# Altium PCB Copy of ASCIIPCB2.pcbdoc (part 2 of 2)
Units mm, origin at the board's own origin, x right, y up, seen from the top; angles counter-clockwise.
Board outline 98.81 x 68.1 mm, 4 copper layers (Top Layer, Signal Layer 1, Signal Layer 2, Bottom Layer), stack 0.778 mm thick; 113 components, 59 nets, 280 pads, 406 vias.
Unrouted connection lines stored in the file: 16.
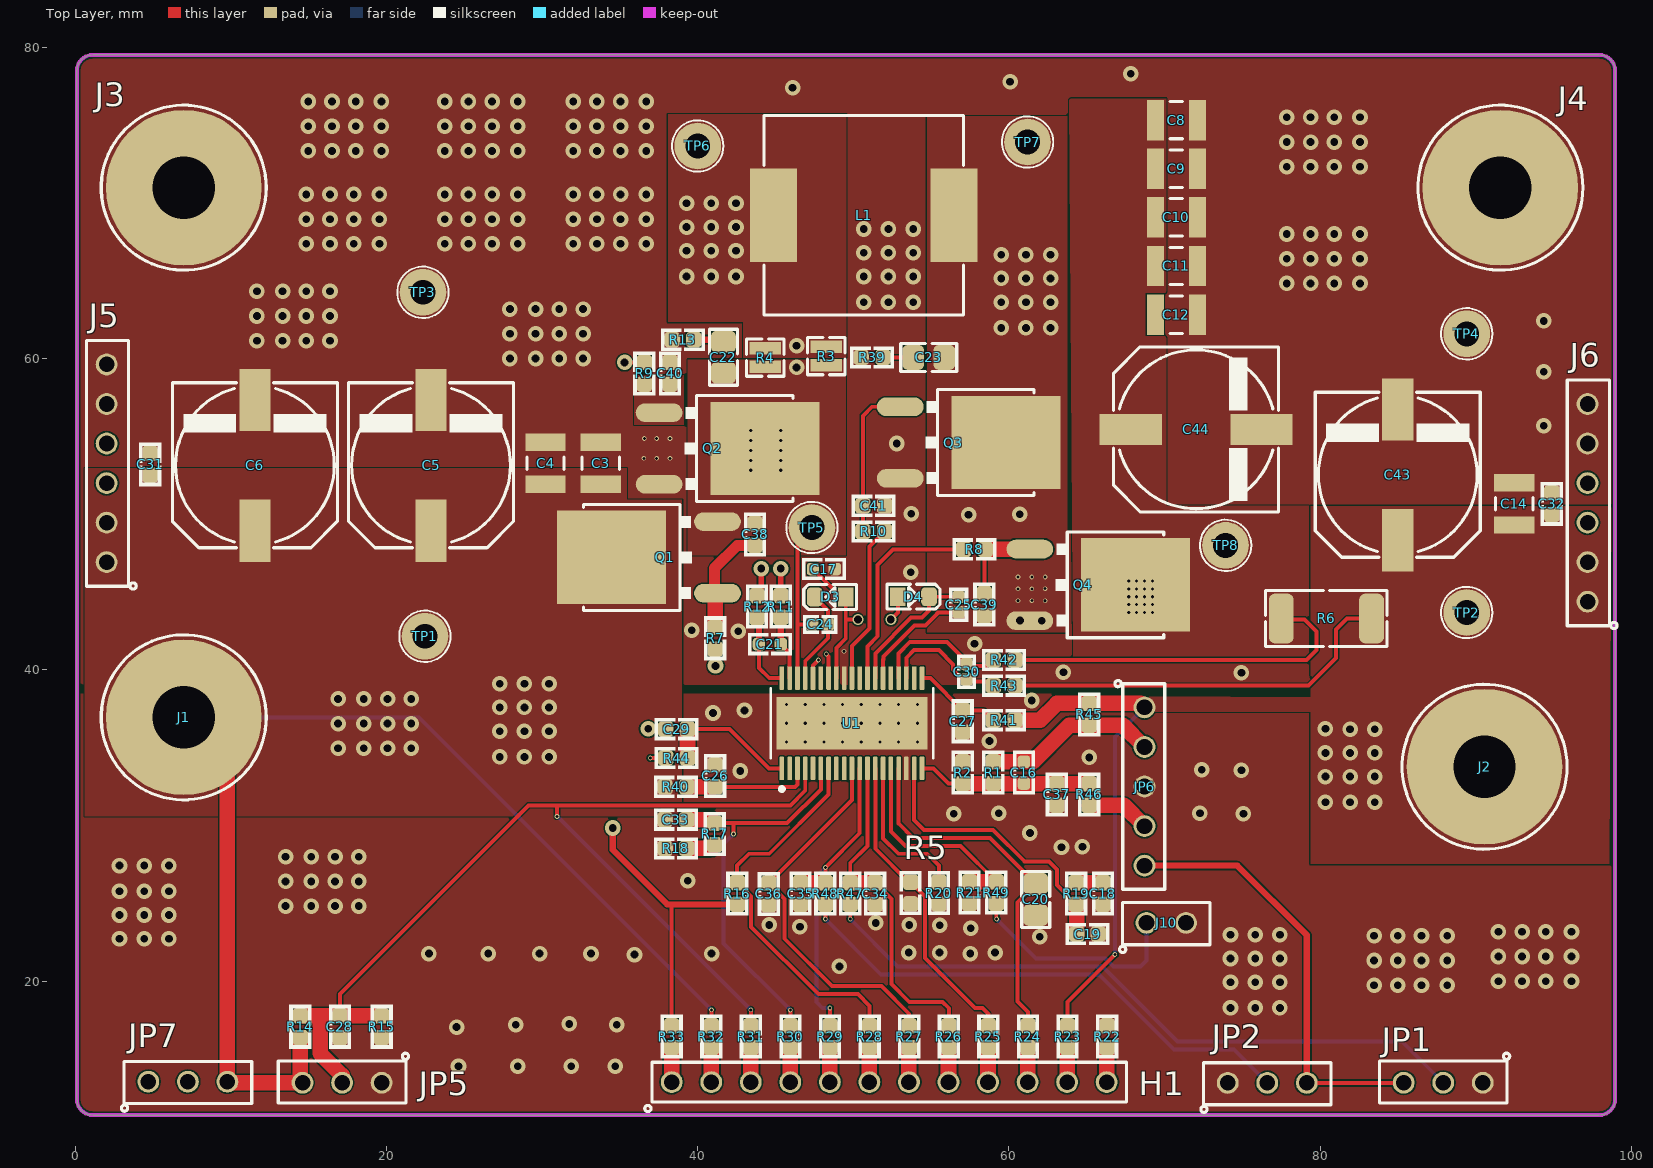
[diagram p0: Top Layer view]

## Part data (continued)
R45: library part CMP-0022751-4, "RES, 10.0, 1%, 0.1 W, 0603", Manufacturer=Yageo, Power_W=100mW, Supplier Part Number 1=311-10.0HRCT-ND, TempCo="100 ppm/C", Tolerance_%=1%, Value2=0.1W, Value_Code=10R0, ValueDisplayed=10.0, AddInBom=yes, AEC Category=Q200, AEC Grade=N/A, AEC Qualified=N, ComponentLink1Description="Datasheet link", ComponentLink1URL=http://www.yageo.com/pdf/Pu-RC0603_51_PbFree_L_2.pdf, CompType=Resistor, DesignItemID=CMP-0022751-4, Device=CMP-0022751-4, EIA_Code=E96, FootprintName=0603S, LibraryName="Altium Vault - TI", MountType=SMT, Origin Footprint=0603, OriginFootprint 2=0603_HV, OriginFootprint 3=0603L, OriginFootprint 4=0603M, PackageReference=0603, PartNumber=RC0603FR-0710RL, Res_ohm=10, RoHS=Y, SizeArea_mm2=1.28, SizeAreaWB_mm2=4.68, SizeX_mm=1.6, SizeY_mm=0.8, SizeZ_mm=1, Supplier 1=Digi-Key, Supplier 2=Mouser, Supplier 3=Farnell, Supplier Part Number 2=603-RC0603FR-0710RL, Supplier Part Number 3=9238247, Symbol=CMP-0022751-4, Technology="Thick Film", UniqueId=fe3640da4f52432f, Value1=1%, VDC_V=75V
TP1: library part CMP-0055147-2, "Test Point, Multipurpose, Red, TH", Color=Red, Manufacturer="Keystone Electronics", Supplier Part Number 1=36-5010-ND, AddInBom=yes, CNHeader=FALSE, ComponentLink1Description="Datasheet URL", ComponentLink1URL=http://www.keyelco.com/userAssets/file/M60-2p60.pdf, CompType="Test Point", ContactFinish=Silver, CT=TRUE, DesignItemID=CMP-0055147-2, Device=CMP-0055147-2, FootprintName=Keystone5010, Green_EU RoHS=Passed, Green_EU RoHS-2=Incomplete, Green_Lifecycle=Active, Green_REACh=Passed, LatestRevisionDate=26/05/2017, LibraryName="Altium Vault - TI", MountType=TH, OriginModelName=Keystone_5010, PackageReference="Red Multipurpose Testpoint", PartNumber=5010, Publisher="Texas Instruments", RoHS=Y, Supplier 1=Digi-Key, Supplier 2=Mouser, Supplier Part Number 2=534-5010, Symbol=CMP-0055147-2, UniqueId=4726d92b84fba278
TP2 TP8: library part CMP-0055150-2, "Test Point, Multipurpose, Orange, TH", Color=Orange, Manufacturer="Keystone Electronics", Supplier Part Number 1=36-5013-ND, AddInBom=yes, CNHeader=FALSE, ComponentLink1Description="Datasheet URL", ComponentLink1URL=http://www.keyelco.com/userAssets/file/M60-2p60.pdf, CompType="Test Point", ContactFinish=Silver, CT=TRUE, DesignItemID=CMP-0055150-2, Device=CMP-0055150-2, FootprintName=Keystone5013, Green_EU RoHS=Passed, Green_EU RoHS-2=Incomplete, Green_Lifecycle=Active, Green_REACh=Passed, LatestRevisionDate=26/05/2017, LibraryName="Altium Vault - TI", MountType=TH, OriginModelName=Keystone_5013, PackageReference="Orange Multipurpose Testpoint", PartNumber=5013, Publisher="Texas Instruments", RoHS=Y, Supplier 1=Digi-Key, Supplier 2=Mouser, Supplier Part Number 2=534-5013, Symbol=CMP-0055150-2
  TP2: UniqueId=21ffbae72f4f4154
  TP8: UniqueId=375a2f0a72128209
TP3 TP4: library part CMP-0055148-2, "Test Point, Multipurpose, Black, TH", Color=Black, Manufacturer="Keystone Electronics", Supplier Part Number 1=36-5011-ND, AddInBom=yes, CNHeader=FALSE, ComponentLink1Description="Datasheet URL", ComponentLink1URL=http://www.keyelco.com/userAssets/file/M60-2p60.pdf, CompType="Test Point", ContactFinish=Silver, CT=TRUE, DesignItemID=CMP-0055148-2, Device=CMP-0055148-2, FootprintName=Keystone5011, Green_EU RoHS=Passed, Green_EU RoHS-2=Incomplete, Green_Lifecycle=Active, Green_REACh=Passed, LatestRevisionDate=26/05/2017, LibraryName="Altium Vault - TI", MountType=TH, OriginModelName=Keystone_5011, PackageReference="Black Multipurpose Testpoint", PartNumber=5011, Publisher="Texas Instruments", RoHS=Y, Supplier 1=Digi-Key, Supplier 2=Mouser, Supplier Part Number 2=534-5011, Symbol=CMP-0055148-2
  TP3: UniqueId=8df4c48c9acaaf69
  TP4: UniqueId=6410be24ff53b3b6
TP5 TP6: library part CMP-0055149-2, "Test Point, Multipurpose, White, TH", Color=White, Manufacturer="Keystone Electronics", Supplier Part Number 1=36-5012-ND, AddInBom=yes, CNHeader=FALSE, ComponentLink1Description="Datasheet URL", ComponentLink1URL=http://www.keyelco.com/userAssets/file/M60-2p60.pdf, CompType="Test Point", ContactFinish=Silver, CT=TRUE, DesignItemID=CMP-0055149-2, Device=CMP-0055149-2, FootprintName=Keystone5012, Green_EU RoHS=Passed, Green_EU RoHS-2=Incomplete, Green_Lifecycle=Active, Green_REACh=Passed, LatestRevisionDate=26/05/2017, LibraryName="Altium Vault - TI", MountType=TH, OriginModelName=Keystone_5012, PackageReference="White Multipurpose Testpoint", PartNumber=5012, Publisher="Texas Instruments", RoHS=Y, Supplier 1=Digi-Key, Supplier 2=Mouser, Supplier Part Number 2=534-5012, Symbol=CMP-0055149-2
  TP5: UniqueId=f7ec211fb22f3ea3
  TP6: UniqueId=84aa4de12bc2747c
TP7: library part CMP-0055159-2, "Test Point, Multipurpose, Grey, TH", Color=Grey, Manufacturer="Keystone Electronics", Supplier Part Number 1=36-5128-ND, AddInBom=yes, CNHeader=FALSE, ComponentLink1Description="Datasheet URL", ComponentLink1URL=http://www.keyelco.com/userAssets/file/M60-2p60.pdf, CompType="Test Point", ContactFinish=Silver, CT=TRUE, DesignItemID=CMP-0055159-2, Device=CMP-0055159-2, FootprintName=Keystone5128, Green_EU RoHS=Passed, Green_EU RoHS-2=Incomplete, Green_Lifecycle=Active, Green_REACh=Passed, LatestRevisionDate=26/05/2017, LibraryName="Altium Vault - TI", MountType=TH, OriginModelName=Keystone_5128, PackageReference="Grey Multipurpose Testpoint", PartNumber=5128, Publisher="Texas Instruments", RoHS=Y, Supplier 1=Digi-Key, Supplier 2=Newark, Supplier 3=Mouser, Supplier Part Number 2=95M2500, Supplier Part Number 3=534-5128, Symbol=CMP-0055159-2, UniqueId=7a581efd1dfccb02
U1: library part CMP-0094661-2, "Wide VIN Bidirectional 4 Switch Buck-Boost Controller", Manufacturer="Texas Instruments", Manufacturer Lifecycle Status=ACTIVE, Max Supply Voltage=78V, Min Supply Voltage=2.8V, Nominal Supply Current=25uA, Operating Temperature Range="-40癈 to +125癈", Output Voltage=3.3-78V, Switching Frequency=100-2000kHz, AddInBom=yes, AEC Category=Q200, AEC Qualified=No, ComponentLink1Description="Datasheet Link", ComponentLink1URL=http://www.ti.com/lit/ds/symlink/GPN.pdf, ComponentLink2Description="Product Folder", ComponentLink2URL=http://www.ti.com/product/GPN, ComponentLink3Description="Online Datasheet", ComponentLink3URL=http://www.ti.com/product/GPN/datasheet, ComponentLink4Description=https://sigma.octopart.com:443/150835829/technical_drawing/Texas-Instruments-LM5177DCPR.pdf?src-supplier=Texas+Instruments, ComponentLink4URL=https://sigma.octopart.com:443/150835829/technical_drawing/Texas-Instruments-LM5177DCPR.pdf?src-supplier=Texas+Instruments, ComponentLink5Description=https://octopart.com:443/opatz8j6/c1?t=2meVI9Ys0v26m6bGgLUs4HyxqDgUi_PdijUQkLRB7X3oIMPJ_2DwIqJBGNM9bLa65FmSJmDfBBHzW_XgTEo_27W85jUwvA41jdc23-HisQNZRYaAw8K-zZISmAQrU3bxfEjix9O-NAgtvU4A5AwwDONWmssYZYy-blMv1qKAk4-AKD6qt0hPy3dOUHQAGBQfd-QqZL0d02my4YO46Ni3ATYEmeA6-_BjLvvyW2wXtOpBI_TaTwFyIkmihkdWQNB7lh0T8UMKem9CuUww2GwlSvoQ313VuhdoUvOroaEBkTowtT-WEqcS3g7wEAlf5_jWm8VZvGHioz5-o2QYiqOAEg4vGEjUpPa72dceAeX_PxWG8WqZKv51mQleYH2pctfMbjZwhw&src-supplier=Texas+Instruments, ComponentLink5URL=https://octopart.com:443/opatz8j6/c1?t=2meVI9Ys0v26m6bGgLUs4HyxqDgUi_PdijUQkLRB7X3oIMPJ_2DwIqJBGNM9bLa65FmSJmDfBBHzW_XgTEo_27W85jUwvA41jdc23-HisQNZRYaAw8K-zZISmAQrU3bxfEjix9O-NAgtvU4A5AwwDONWmssYZYy-blMv1qKAk4-AKD6qt0hPy3dOUHQAGBQfd-QqZL0d02my4YO46Ni3ATYEmeA6-_BjLvvyW2wXtOpBI_TaTwFyIkmihkdWQNB7lh0T8UMKem9CuUww2GwlSvoQ313VuhdoUvOroaEBkTowtT-WEqcS3g7wEAlf5_jWm8VZvGHioz5-o2QYiqOAEg4vGEjUpPa72dceAeX_PxWG8WqZKv51mQleYH2pctfMbjZwhw&src-supplier=Texas+Instruments, ComponentLink6Description=http://sigma.octopart.com:80/reach_statement/Texas-Instruments-company-64.pdf?src-supplier=Compliance+Statements, ComponentLink6URL=http://sigma.octopart.com:80/reach_statement/Texas-Instruments-company-64.pdf?src-supplier=Compliance+Statements, ComponentLink7Description=http://sigma.octopart.com:80/conflict_mineral_statement/Texas-Instruments-company-63.pdf?src-supplier=Compliance+Statements, ComponentLink7URL=http://sigma.octopart.com:80/conflict_mineral_statement/Texas-Instruments-company-63.pdf?src-supplier=Compliance+Statements, CompType=IC, Datasheet Path=datasheets/IC-LM5177DCPR.pdf, DesignItemID=CMP-0094661-2, Device=CMP-0094661-2, FootprintName=DCP0038A-MFG, Height=1.2mm, helpURL=https://upverter.com/upn/revision/d4783a621c1931dd/, Length=9.7mm, LibraryName="Altium Vault - TI", Lifecycle Status=Production, Manufacturer Part Number=LM5177DCPR, Max Duty Cycle=100%, Number Of Outputs=2, Number of Pins=38, Origin Footprint=DCP0038A-IPC_C, OriginFootprint 2=DCP0038A-IPC_B, OriginFootprint 3=DCP0038A-IPC_A, OriginModelName=IC_LM5177DCPR_HTSSOP38, Output Type=AdjustableProgrammable, PackageReference=HTSSOP38, Part Number=LM5177DCPR, PartNumber=LM5177DCPR, Pricing 1="1=8.46, 10=6.55, 50=6.08, 100=5.55, 1000=5.42, 10000=4.6 (USD)", RoHS=UNKNOWN, SizeZ_mm=1.2mm, Standoff Height=0.05mm, Stock 1=741, Supplier 1=Mouser, Switching Topology=Buck-Boost, Symbol=CMP-0094661-2, Thickness=1.15mm, TJmax_C=+125癈, Topology=Buck-Boost, UniqueId=1bdc0ab44f99f92d, Width=4.4mm

## Via types
v1: diameter 1, hole 0.5, Top Layer to Bottom Layer, 318 vias
v2: diameter 0.3, hole 0.2, Top Layer to Bottom Layer, 60 vias
v3: diameter 0.5, hole 0.2, Top Layer to Bottom Layer, 24 vias
v4: diameter 0.711, hole 0.5, Top Layer to Bottom Layer, 4 vias

## Nets (pads, with @x,y where several pads share a name; then routed paths per layer and width w, separated by ;. In a path a pad name is that pad's centre, name@x,y a point inside that pad or via, vN(x,y) a via of type N, cw(c..) or ccw(c..) an arc to the next point about the centre after c; other vN are vias at no path point)
AGND: C3.1 C4.1 C5.2 C6.2 C8.1 C9.1 C10.1 C11.1 C12.1 C14.1 C17.1 C18.1 C19.1 C20.1 C26.2 C27.2 C28.2 C29.1 C31.2 C32.2 C33.1 C34.2 C35.2 C36.2 C37.2 C40.1 C41.1 C43.2 C44.2 D2.1 J3.1 J4.1 J5.5 J5.6 J6.5 J6.6 J10.2 JP1.1 JP2.1 JP5.1 JP6.3 Q2.3 Q3.3 R2.1 R5.1 R13.1 R15.1 R18.1 R20.1 R21.1 R22.1 R39.1 TP3.1 TP4.1 U1.17 U1.30 U1.39 | length 1.1
  Top Layer w0.254: v1(36.826,36.22) 37.925,36.22 C29.1
  other v1: 24.638,14.541 28.448,14.541 31.877,14.541 34.709,14.541 24.511,17.055 28.321,17.205 34.798,17.209 31.75,17.264 74.231,18.288 75.819,18.288 77.406,18.288 83.452,19.748 84.976,19.748 86.5,19.748 88.151,19.748 74.231,19.939 75.819,19.939 77.406,19.939 91.44,20.002 92.964,20.002 94.488,20.002 96.139,20.002 49.105,20.955 83.452,21.336 84.976,21.336 86.5,21.336 88.151,21.336 74.231,21.463 75.819,21.463 77.406,21.463 91.44,21.59 92.964,21.59 94.488,21.59 96.139,21.59 35.941,21.717 22.733,21.78 26.543,21.78 29.845,21.78 33.147,21.78 40.894,21.78 57.511,21.78 53.554,21.844 55.543,21.844 59.106,21.844 2.857,22.733 4.445,22.733 6.032,22.733 61.976,22.86 83.452,22.924 84.976,22.924 86.5,22.924 88.151,22.924 74.231,22.987 75.819,22.987 77.406,22.987 91.44,23.177 92.964,23.177 94.488,23.177 96.139,23.177 57.546,23.41 46.568,23.499 55.554,23.595 44.604,23.622 53.591,23.622 51.437,23.748 2.857,24.257 4.445,24.257 6.032,24.257 13.53,24.828 15.181,24.828 16.705,24.828 18.229,24.828 2.857,25.781 4.445,25.781 6.032,25.781 13.53,26.416 15.181,26.416 16.705,26.416 18.229,26.416 39.37,26.459 2.857,27.432 4.445,27.432 6.032,27.432 13.53,28.003 15.181,28.003 16.705,28.003 18.229,28.003 63.373,28.609 64.72,28.639 61.345,29.527 56.456,30.756 75.057,30.756 59.338,30.794 72.263,30.788 42.73,33.508 74.93,33.558 72.39,33.585 65.151,34.382 58.74,35.433 40.988,37.235 43.01,37.403 61.468,38.036 74.93,39.814 63.5,39.859 57.791,41.681 42.603,42.481 39.624,42.545 53.683,46.273 53.721,50.036 52.784,54.546 94.361,55.689 94.361,59.15 27.94,60.008 29.591,60.008 31.115,60.008 32.639,60.008 11.684,61.151 13.335,61.151 14.859,61.151 16.383,61.151 27.94,61.595 29.591,61.595 31.115,61.595 32.639,61.595 94.361,62.42 11.684,62.738 13.335,62.738 14.859,62.738 16.383,62.738 27.94,63.182 29.591,63.182 31.115,63.182 32.639,63.182 50.671,63.627 52.258,63.627 53.846,63.627 11.684,64.325 13.335,64.325 14.859,64.325 16.383,64.325 77.851,64.834 79.375,64.834 80.899,64.834 82.55,64.834 50.671,65.278 52.258,65.278 53.846,65.278 77.851,66.421 79.375,66.421 80.899,66.421 82.55,66.421 50.671,66.802 52.258,66.802 53.846,66.802 14.859,67.373 16.383,67.373 17.907,67.373 19.558,67.373 23.749,67.373 25.273,67.373 26.797,67.373 28.448,67.373 32.004,67.373 33.528,67.373 35.052,67.373 36.703,67.373 77.851,68.008 79.375,68.008 80.899,68.008 82.55,68.008 50.671,68.326 52.258,68.326 53.846,68.326 14.859,68.961 16.383,68.961 17.907,68.961 19.558,68.961 23.749,68.961 25.273,68.961 26.797,68.961 28.448,68.961 32.004,68.961 33.528,68.961 35.052,68.961 36.703,68.961 14.859,70.549 16.383,70.549 17.907,70.549 19.558,70.549 23.749,70.549 25.273,70.549 26.797,70.549 28.448,70.549 32.004,70.549 33.528,70.549 35.052,70.549 36.703,70.549 77.851,72.326 79.375,72.326 80.899,72.326 82.55,72.326 14.986,73.343 16.51,73.343 18.034,73.343 19.685,73.343 23.749,73.343 25.273,73.343 26.797,73.343 28.448,73.343 32.004,73.343 33.528,73.343 35.052,73.343 36.703,73.343 77.851,73.914 79.375,73.914 80.899,73.914 82.55,73.914 14.986,74.93 16.51,74.93 18.034,74.93 19.685,74.93 23.749,74.93 25.273,74.93 26.797,74.93 28.448,74.93 32.004,74.93 33.528,74.93 35.052,74.93 36.703,74.93 77.851,75.501 79.375,75.501 80.899,75.501 82.55,75.501 14.986,76.517 16.51,76.517 18.034,76.517 19.685,76.517 23.749,76.517 25.273,76.517 26.797,76.517 28.448,76.517 32.004,76.517 33.528,76.517 35.052,76.517 36.703,76.517 46.101,77.406 60.071,77.787 67.818,78.295
  other v2: 49.403,41.201 36.545,53.594 37.366,53.594 38.224,53.594 36.576,54.864 37.366,54.864 38.227,54.864
  other v3: 45.711,35.376 46.911,35.376 48.111,35.376 49.311,35.376 50.511,35.376 51.711,35.376 52.911,35.376 54.111,35.376 45.711,36.576 46.911,36.576 48.111,36.576 49.311,36.576 50.511,36.576 51.711,36.576 52.911,36.576 54.111,36.576 45.711,37.776 46.911,37.776 48.111,37.776 49.311,37.776 50.511,37.776 51.711,37.776 52.911,37.776 54.111,37.776
BIAS: C29.2 R44.1 U1.1 | length 9
  Top Layer w0.254: C29.2 42.055,36.195 44.574,33.676 U1.1
  Top Layer w1: R44.1 C29.2
CFG: R5.2 R25.1 U1.13 | length 19.9
  Top Layer w0.254: U1.13 51.411,28.513 53.553,26.371 R5.2 54.614,25.437 54.614,21.498 57.824,18.288 58.293,18.288 58.677,17.904 R25.1
COMP: C19.2 R19.2 U1.18 | length 18.5
  Top Layer w0.254: U1.18 53.911,30.35 54.543,29.718 58.979,29.718 61.011,27.686 62.568,27.686 63.076,27.178 63.076,26.181 R19.2
  Top Layer w1: R19.2 64.344,24.913 C19.2
CSA/SW1: C21.2 R11.1 U1.37 | length 4.1
  Top Layer w0.254: C21.2 45.911,41.084 U1.37
  Top Layer w0.4: C21.2 R11.1
CSB: C21.1 R12.1 U1.38 | length 5
  Top Layer w0.254: C21.1 43.939,40.135 44.598,39.476 U1.38
  Top Layer w0.4: R12.1 43.939,43.245 C21.1
DTRK: C36.1 R27.1 U1.10 | length 24.3
  Top Layer w0.254: U1.10 49.911,31.649 C36.1 45.593,25.294 45.593,22.733 48.641,19.685 51.816,19.685 53.591,17.91 R27.1
EN/UVLO: C28.1 JP5.2 R14.1 R15.2 R31.1 U1.4 | length 67.6
  Top Layer w0.254: C28.1 17.018,19.177 29.145,31.304 30.988,31.304 ; v2(30.968,30.587) 30.968,31.284 30.988,31.304 ; v2(43.414,18.161) 43.419,18.156 R31.1 ; U1.4 46.911,32.25 45.965,31.304 30.988,31.304
  Top Layer w1: R14.1 15.748,17.78 ; JP5.2 17.158,13.957 15.748,15.367 15.748,17.78 ; R15.2 C28.1 15.748,17.78
  Bottom Layer w0.254: v2@30.988,30.587 v2(43.414,18.161)
FB: C16.2 C37.1 R1.2 R2.2 R46.1 U1.19 | length 11.1
  Top Layer w0.254: U1.19 55.142,33.676 56.117,32.701 R2.2
  Top Layer w1: R2.2 R1.2 C16.2 C37.1 65.148,32.701 R46.1
FLT: R16.2 R28.1 U1.7 | length 24.7
  Top Layer w0.254: U1.7 48.411,32.007 44.598,28.194 43.311,28.194 42.541,27.424 42.541,26.346 R16.2 43.43,25.457 43.43,23.499 47.752,19.177 50.292,19.177 51.049,18.42 R28.1
HB1: C24.2 D3.2 U1.35 | length 6.2
  Top Layer w0.254: U1.35 46.911,40.577 48.371,42.037 C24.2 48.371,43.833 D3.2
HB2: C25.2 D4.2 U1.26 | length 9
  Top Layer w0.254: U1.26 51.411,40.894 ; 51.419,40.894 51.419,41.07 53.718,43.369 54.418,43.369 54.864,43.815 D4.2 56.761,44.704 C25.2
HO1: R7.1 U1.34 | length 9.2
  Top Layer w0.254: R7.1 41.128,40.279 v1(41.148,40.259) ; U1.34 47.411,40.299 v2(47.752,40.64)
  Signal Layer 1 w0.254: v1(41.148,40.259) 41.529,40.64 v2(47.752,40.64)
HO1_G: C38.1 Q1.1 R7.2 | length 7.3
  Top Layer w0.7: Q1.1@41.09,44.69 41.09,46.551 42.541,48.002 43.687,48.002 C38.1
  Top Layer w1: R7.2 41.128,44.783 Q1.1
HO2: R8.1 U1.27 | length 13.5
  Top Layer w0.254: U1.27 50.911,41.513 51.562,42.164 51.562,46.754 52.56,47.752 R8.1
HO2_G: C39.2 Q4.1 R8.2 | length 5.7
  Top Layer w0.254: C39.2 58.42,47.687 R8.2 R8.2@58.499,47.766
  Top Layer w1: R8.2@58.499,47.766 Q4.1
IMONOUT: C33.2 R17.2 R30.1 U1.6 | length 26
  Top Layer w0.254: R17.2 42.291,30.164 ; v2(42.305,29.464) 42.305,30.15 42.291,30.164 ; v2(45.954,18.143) 45.961,18.136 R30.1 ; U1.6 47.911,32.332 45.743,30.164 42.291,30.164
  Top Layer w1: C33.2 40.868,30.386 R17.2
  Bottom Layer w0.254: v2(42.305,29.464) 41.656,28.815 41.656,22.441 v2(45.954,18.143)
ISNSN: C30.1 R43.1 U1.22 | length 8.2
  Top Layer w0.254: U1.22 53.411,40.775 ; 53.419,40.775 53.419,40.783 53.911,41.275 55.499,41.275 56.418,40.356 56.418,40.013 57.18,39.251 58.728,39.251 R43.1
ISNSP: C30.2 R42.1 U1.23 | length 9.1
  Top Layer w0.254: U1.23 52.911,41.07 53.624,41.783 56.027,41.783 57.023,40.787 57.023,40.251 58.601,40.251 R42.1
LO1: R9.2 U1.32 | length 27
  Top Layer w0.254: v1(35.306,59.755) R9.2 ; v2(48.26,41.021) 48.411,40.87 U1.32
  Signal Layer 1 w0.254: v1(35.306,59.755) 35.306,53.999 35.294,53.987 43.934,45.347 v2(48.26,41.021)
LO1_G: C40.2 Q2.1 R9.1
LO2: R10.2 U1.29 | length 10.3
  Top Layer w0.254: U1.29 49.911,41.529 51.034,42.652 51.034,47.921 R10.2
LO2_G: C41.2 Q3.1 R10.1 | length 10.1
  Top Layer w0.254: R10.1 C41.2 50.608,56.323 51.195,56.91 Q3.1
MODE: C34.1 R26.1 R47.2 U1.12 | length 21.8
  Top Layer w0.254: R47.2 49.803,27.594 50.911,28.702 U1.12 ; C34.1 52.451,25.287 52.451,19.812 53.594,18.669 55.733,18.669 56.134,18.268 R26.1
  Top Layer w1: R47.2 C34.1
NetC8_2: C8.2 C9.2 C10.2 C11.2 C44.1 D1.2 Q4.4 R6.1 R42.2 TP8.1 | length 23.4
  Top Layer w0.254: R42.2 79.121,40.64 79.756,41.275 79.756,42.483 78.994,43.245 R6.1@77.553,43.245
  Top Layer w1: R6.1 R6.1@77.553,43.245
  other v2: 67.691,43.688 68.199,43.688 68.707,43.688 69.215,43.688 67.691,44.196 68.199,44.196 68.707,44.196 69.215,44.196 67.691,44.704 68.199,44.704 68.707,44.704 69.215,44.704 67.691,45.212 68.199,45.212 68.707,45.212 69.215,45.212 67.691,45.72 68.199,45.72 68.707,45.72 69.215,45.72
NetC16_1: C16.1 JP6.2 R1.1 R45.1 | length 11.3
  Top Layer w1: R1.1 C16.1 61.533,34.101 63.881,36.449 R45.1 67.31,36.449 JP6.2
NetC18_2: C18.2 R19.1 | length 1.7
  Top Layer w1: R19.1 C18.2
NetC22_1: C22.1 R13.2 | length 2
  Top Layer w0.4: R13.2 41.529,61.214 C22.1
NetC23_1: C23.1 R39.2 | length 1.9
  Top Layer w0.254: R39.2 C23.1
NetC26_1: C26.1 R40.1 U1.3 | length 8.2
  Top Layer w0.254: C26.1@41.107,32.492 46.264,32.492 46.411,32.639 U1.3
  Top Layer w1: R40.1 C26.1@41.107,32.492
NetC27_1: C27.1 R41.1 U1.20 | length 5.7
  Top Layer w0.254: U1.20 54.95,39.476 C27.1 58.361,37.403 R41.1
NetH1_1: H1.1 R33.2 | length 2.2
  Top Layer w1: H1.1 R33.2
NetH1_2: H1.2 R32.2 | length 2.2
  Top Layer w1: H1.2 40.874,15.739 R32.2
NetH1_3: H1.3 R31.2 | length 2.2
  Top Layer w1: H1.3 43.414,15.736 R31.2
NetH1_4: H1.4 R30.2 | length 2.2
  Top Layer w1: H1.4 45.954,15.734 R30.2
NetH1_5: H1.5 R29.2 | length 2.2
  Top Layer w1: H1.5 48.494,15.729 R29.2
NetH1_6: H1.6 R28.2 | length 2.2
  Top Layer w1: H1.6 51.034,15.726 R28.2
NetH1_7: H1.7 R27.2 | length 2.2
  Top Layer w1: H1.7 53.574,15.724 R27.2
NetH1_8: H1.8 R26.2 | length 2.2
  Top Layer w1: H1.8 56.114,15.721 R26.2
NetH1_9: H1.9 R25.2 | length 2.2
  Top Layer w1: H1.9 58.654,15.719 R25.2
NetH1_10: H1.10 R24.2 | length 2.2
  Top Layer w1: H1.10 61.194,15.713 R24.2
NetH1_11: H1.11 R23.2 | length 2.2
  Top Layer w1: H1.11 63.734,15.711 R23.2
NetH1_12: H1.12 R22.2 | length 2.2
  Top Layer w1: H1.12 66.274,15.708 R22.2
NetJ10_1: J10.1 R49.2 | length 14.5
  Top Layer w0.254: R49.2 59.183,24.03 v2(59.21,24.003)
  Bottom Layer w0.254: v2(59.21,24.003) 61.75,21.463 66.207,21.463 66.715,20.955 68.453,20.955 68.834,21.336 J10.1
NetJP1_2: JP1.2 R47.1 | length 43.4
  Top Layer w0.254: v2(49.803,24.003) R47.1
  Bottom Layer w0.254: v2(49.803,24.003) 52.851,20.955 65.996,20.955 70.822,16.129 85.25,16.129 JP1.2
NetJP2_2: JP2.2 R48.1 | length 33.7
  Top Layer w0.254: v2(48.206,24.003) R48.1
  Bottom Layer w0.254: v2(48.206,24.003) 51.762,20.447 65.786,20.447 70.612,15.621 74.442,15.621 JP2.2
NetJP7_2: JP7.2 R44.2 | length 42.4
  Top Layer w0.254: v2(36.957,34.343) R44.2
  Signal Layer 1 w0.254: JP7.2 16.436,22.733 30.607,22.733 36.322,28.448 36.322,33.708 v2(36.957,34.343)
NetL1_1: L1.1 R3.2 R4.2 R12.2 TP6.1 | length 17.1
  Top Layer w0.381: R12.2 44.085,45.039 v1(44.085,46.513)
  Signal Layer 2 w0.381: v1(44.085,46.513) 44.085,58.563 v1(46.355,60.833)
  other v1: 39.289,65.278 40.876,65.278 42.464,65.278 39.289,66.929 40.876,66.929 42.464,66.929 39.289,68.453 40.876,68.453 42.464,68.453 39.289,69.977 40.876,69.977 42.464,69.977
NetR17_1: R17.1 R18.2 | length 1.9
  Top Layer w1: R18.2 40.86,28.534 R17.1
R_FB: JP6.4 R46.2 | length 4.1
  Top Layer w1: R46.2 67.375,31.304 JP6.4
RT: R21.2 R49.1 U1.15 | length 13.9
  Top Layer w0.254: 52.411,29.885 U1.15 ; 52.427,29.877 52.427,29.615 53.34,28.702 56.875,28.702 R49.1
  Top Layer w1: R21.2 R49.1
SLOPE: R20.2 U1.14 | length 9.9
  Top Layer w0.254: 51.911,29.877 U1.14 ; 51.919,29.877 51.919,29.176 52.901,28.194 54.737,28.194 55.499,27.432 R20.2
SS/ATRK: C20.2 R24.1 U1.16 | length 23.8
  Top Layer w0.254: 52.911,30.147 U1.16 ; 52.919,30.147 52.919,30.139 53.848,29.21 58.769,29.21 C20.2 60.541,25.076 60.541,18.707 61.222,18.026 R24.1
SW1: C22.2 C24.1 C38.2 D2.2 Q1.3 Q2.4 R3.1 R4.1 R11.2 TP5.1 U1.36 | length 26.9
  Top Layer w0.254: U1.36 46.411,42.926 ; TP5.1 46.411,48.22 46.411,42.926 ; C24.1 46.411,42.926
  Top Layer w0.381: R11.2 v1(45.339,46.514)
  Signal Layer 2 w0.381: v1(45.339,46.514) 45.339,46.609 44.72,47.228 44.72,58.286 44.713,58.293 45.856,59.436 v1(46.355,59.436)
  other v2: 43.414,52.832 45.339,52.832 43.414,53.467 45.339,53.467 43.414,54.102 45.339,54.102 43.414,54.737 45.339,54.737 43.414,55.372 45.339,55.372
SW2: C23.2 C25.1 C39.1 D1.1 L1.2 Q3.4 Q4.3 TP7.1 U1.25 | length 7.4
  Top Layer w0.254: U1.25 51.911,40.592 ; 51.919,40.592 51.919,40.676 51.927,40.684 51.927,40.86 53.928,42.861 54.628,42.861 55.372,43.605 55.372,43.626 55.442,43.696 C25.1
  other v1: 57.404,49.974 60.686,50.003 59.499,61.976 61.087,61.976 62.674,61.976 59.499,63.627 61.087,63.627 62.674,63.627 59.499,65.151 61.087,65.151 62.674,65.151 59.499,66.675 61.087,66.675 62.674,66.675
  other v2: 60.579,44.449 61.468,44.45 62.326,44.449 60.579,45.212 61.468,45.212 62.324,45.223 60.579,45.975 61.468,45.975 62.324,45.974
  other v4: 62.103,43.166 60.706,43.18
SYNC: C35.1 R29.1 R48.2 U1.11 | length 20.9
  Top Layer w0.254: R48.2 v2(48.206,27.305) 50.411,29.51 U1.11 ; v2(48.494,18.288) 48.506,18.275 R29.1
  Top Layer w1: C35.1 R48.2
  Bottom Layer w0.254: v2(48.206,27.305) 47.625,26.724 47.625,18.669 48.006,18.288 v2(48.494,18.288)
VCC: C17.2 D3.1 D4.1 JP1.3 JP2.3 JP6.5 R16.1 R33.1 U1.31 | length 109
  Top Layer w0.254: R33.1 38.334,24.918 38.354,24.938 ; C17.2 49.203,44.69 D3.1 49.514,43.307 ; U1.31 48.911,41.418 49.514,42.021 49.514,43.307 ; v4(50.292,43.245) 49.576,43.245 49.514,43.307 ; v4(52.411,43.245) 52.864,43.698 D4.1 D4.1@52.85,44.69 ; JP2.3 85.344,13.47 JP1.3
  Top Layer w0.4: v1(34.544,29.845) 34.544,28.448 38.054,24.938 38.354,24.938 R16.1 ; JP6.5 74.676,27.432 79.134,22.974 JP2.3
  Signal Layer 1 w0.254: v4(50.292,43.245) v4(52.411,43.245) ; JP6.5@68.224,27.432 JP6.5
  Signal Layer 1 w0.4: v1(34.544,29.845) 34.544,36.83 36.195,38.481 47.498,38.481 50.292,41.275 v4(50.292,43.245) ; v4(52.411,43.245) JP6.5@68.224,27.432
VIN: C3.2 C4.2 C5.1 C6.1 C31.1 J1.1 J5.1 J5.2 JP5.3 JP7.3 Q1.4 R14.2 R32.1 R40.2 TP1.1 | length 75.1
  Top Layer w0.254: R32.1 40.876,18.143 v2(40.894,18.161)
  Top Layer w1: J1.1 9.792,34.15 JP7.3 9.858,13.482 JP5.3 14.478,13.622 R14.2
  Bottom Layer w0.254: J1.1 21.603,36.957 22.098,36.957 v2(40.894,18.161)
  other v1: 27.283,34.417 28.87,34.417 30.458,34.417 16.904,34.966 18.555,34.966 20.079,34.966 21.603,34.966 27.283,36.068 28.87,36.068 30.458,36.068 16.904,36.554 18.555,36.554 20.079,36.554 21.603,36.554 27.283,37.592 28.87,37.592 30.458,37.592 16.904,38.141 18.555,38.141 20.079,38.141 21.603,38.141 27.283,39.116 28.87,39.116 30.458,39.116
VOUT: C14.2 C32.1 C43.1 J2.1 J6.1 J6.2 JP6.1 JP7.1 R6.2 R23.1 R41.2 R43.2 R45.2 TP2.1 | length 123.4
  Top Layer w0.254: R43.2 79.243,38.989 81.01,40.756 81.01,42.594 81.723,43.307 R6.2 ; R23.1 63.764,18.679 v2(66.802,21.717)
  Top Layer w1: R41.2 62.001,36.774 63.076,37.849 R45.2 68.45,37.849 JP6.1
  Signal Layer 2 w0.254: JP7.1 10.848,19.685 66.04,19.685 66.802,20.447 v2(66.802,21.717)
  Bottom Layer w0.254: v2(66.802,21.717) 66.802,35.687 JP6.1
  other v1: 80.328,31.496 81.915,31.496 83.502,31.496 80.328,33.147 81.915,33.147 83.502,33.147 80.328,34.671 81.915,34.671 83.502,34.671 81.915,36.195 83.502,36.195 80.328,36.22
pads on no net: C12.2 J5.3 J5.4 J6.3 J6.4 U1.2 U1.5 U1.8 U1.9 U1.21 U1.24 U1.28 U1.33

## Polygon pours and split planes (outlines as drawn)
AGND on Top Layer "Top Layer-GND 1" (solid, pour order 108): 0,79.507 0,38.989 98.933,39.116 98.806,38.989 98.933,79.507
AGND on Top Layer "Top Layer-GND" (solid, pour order 110): 0.13,38.481 98.806,38.481 98.806,11.41 0.655,11.41 0.254,11.811
VIN on Top Layer "Top Layer-VIN" (solid, pour order 96): 0.635,52.959 35.433,52.959 35.433,50.927 38.989,50.927 38.989,30.607 0.635,30.607
SW2 on Top Layer "Top Layer-SW2" (solid, pour order 90): 54.737,75.565 54.737,42.418 63.627,42.418 63.734,42.525 63.734,75.565
VOUT on Top Layer "Top Layer-VOUT" (solid, pour order 106): 79.375,27.536 98.552,27.536 98.677,50.523 79.375,50.523 79.375,38.233 67.183,38.331 67.183,37.315 79.375,37.315
NetC8_2 on Top Layer "Top Layer-NetC8_2" (solid, pour order 92): 63.881,76.708 70.104,76.708 70.104,50.546 79.248,50.546 79.248,40.64 64.262,40.64 64.135,40.767
SW1 on Top Layer "Top Layer-SW1" (solid, pour order 86): 49.514,59.944 49.514,47.371 39.37,47.371 39.37,59.944
no net on Top Layer "Top Layer-No Net 1" (solid, pour order 100): 0,79.375
no net on Top Layer "Top Layer-No Net 2" (solid, pour order 94): 0.635,52.959
NetL1_1 on Top Layer "Top Layer-NetL1_1" (solid, pour order 88): 38.1,75.692 38.1,62.357 42.926,62.357 42.926,60.071 49.514,60.071 49.53,60.087 49.53,75.692
no net on Top Layer "Top Layer-No Net 3" (solid, pour order 84): 39.497,60.198
LO1_G on Top Layer "Top Layer-LO1_G" (solid, pour order 80): 35.941,58.928 39.116,58.928 39.116,55.753 35.941,55.753
no net on Top Layer "Top Layer-No Net" (solid, pour order 78): 42.164,60.198
AGND on Signal Layer 1 "Signal Layer 1-AGND" (solid, pour order 136): 0.381,79.248 0.127,78.994 0.127,38.862 98.425,38.862 98.552,38.989 98.425,39.116 98.425,79.248
VIN on Signal Layer 1 "Signal Layer 1-VIN" (solid, pour order 132): 0.762,52.959 0.635,52.832 0.635,30.607 37.719,30.607 38.989,31.877 38.989,50.927 35.433,50.927 35.306,51.054 35.306,52.959
AGND on Signal Layer 1 "Signal Layer 1-AGND 1" (solid, pour order 138): 0.635,38.354 98.933,38.354 98.679,38.1 98.679,11.557 0.254,11.557 0.127,11.684
NetL1_1 on Signal Layer 1 "Signal Layer 1-NetL1_1" (solid, pour order 134): 38.1,75.692 38.1,62.357 42.926,62.357 42.926,60.198 49.53,60.198 49.53,75.537 49.657,75.664
NetC8_2 on Signal Layer 1 "Signal Layer 1-NetC8_2" (solid, pour order 130): 63.881,76.708 63.881,41.021 79.248,41.021 79.248,50.546 79.184,50.482 70.104,50.482 70.104,76.708
SW2 on Signal Layer 1 "Signal Layer 1-SW2" (solid, pour order 128): 54.737,75.565 54.737,42.418 63.754,42.418 63.734,42.438 63.734,75.565
SW1 on Signal Layer 1 "Signal Layer 1-SW1" (solid, pour order 126): 39.37,59.944 39.37,47.371 49.53,47.371 49.53,59.817 49.403,59.944
LO1_G on Signal Layer 1 "Signal Layer 1-LO1_G" (solid, pour order 124): 35.941,58.928 35.941,55.753 39.116,55.753 39.116,58.928
VOUT on Signal Layer 1 "Signal Layer 1-VOUT" (solid, pour order 122): 79.502,50.546 79.375,50.419 79.375,38.227 67.945,38.227 67.945,37.211 68.072,37.338 79.375,37.338 79.375,27.559 98.552,27.559 98.552,50.419 98.679,50.546
AGND on Signal Layer 2 "Signal Layer 2-AGND" (solid, pour order 140): 0.254,79.248 0,78.994 0,11.41 98.552,11.41 98.552,79.375
no net on Signal Layer 2 "Signal Layer 2-No Net" (solid, pour order 142): 49.311,11.684
AGND on Bottom Layer "Bottom Layer-AGND" (solid, pour order 144): 0.381,79.375 0.381,11.557 0.635,11.811 98.679,11.811 98.679,79.248 98.806,79.375

## Keep-outs
Keep-Out Layer:
  the board outline again, w0.254